# Altium PCB PCB1.PcbDoc
Units mm, origin at the board's own origin, x right, y up, seen from the top; angles counter-clockwise.
Board outline 35.56 x 20.95 mm, 2 copper layers (Top Layer, Bottom Layer), stack 1.671 mm thick; 13 components, 8 nets, 33 pads, 0 vias.
Unrouted connection lines stored in the file: 2.
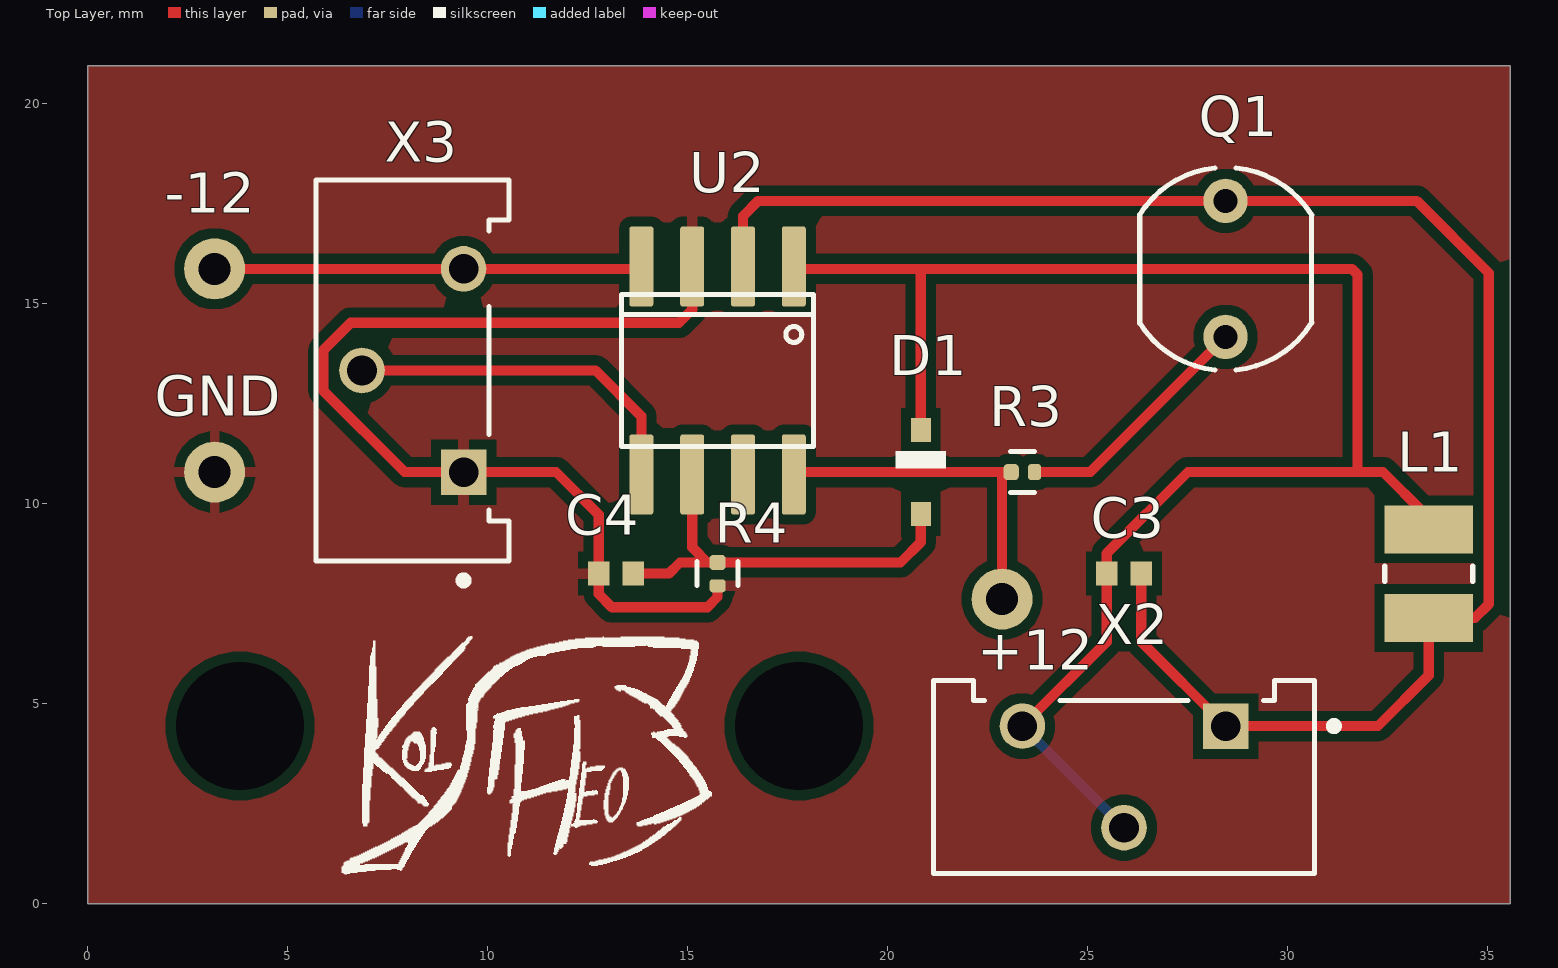
[diagram p0: Top Layer view]
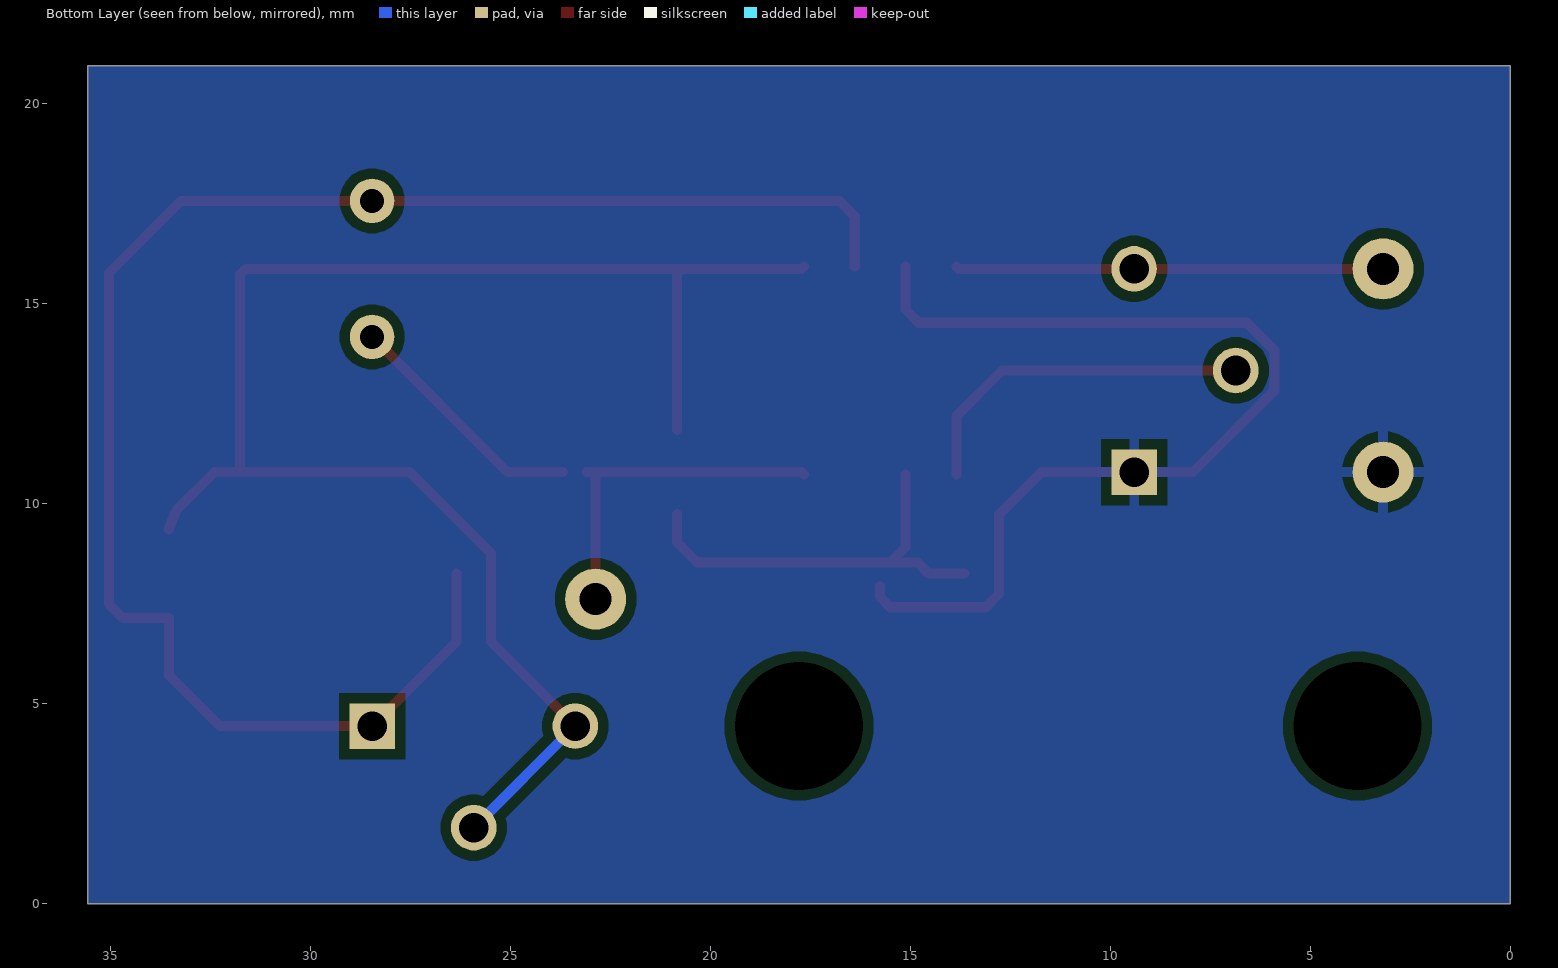
[diagram p1: Bottom Layer view, seen from below]
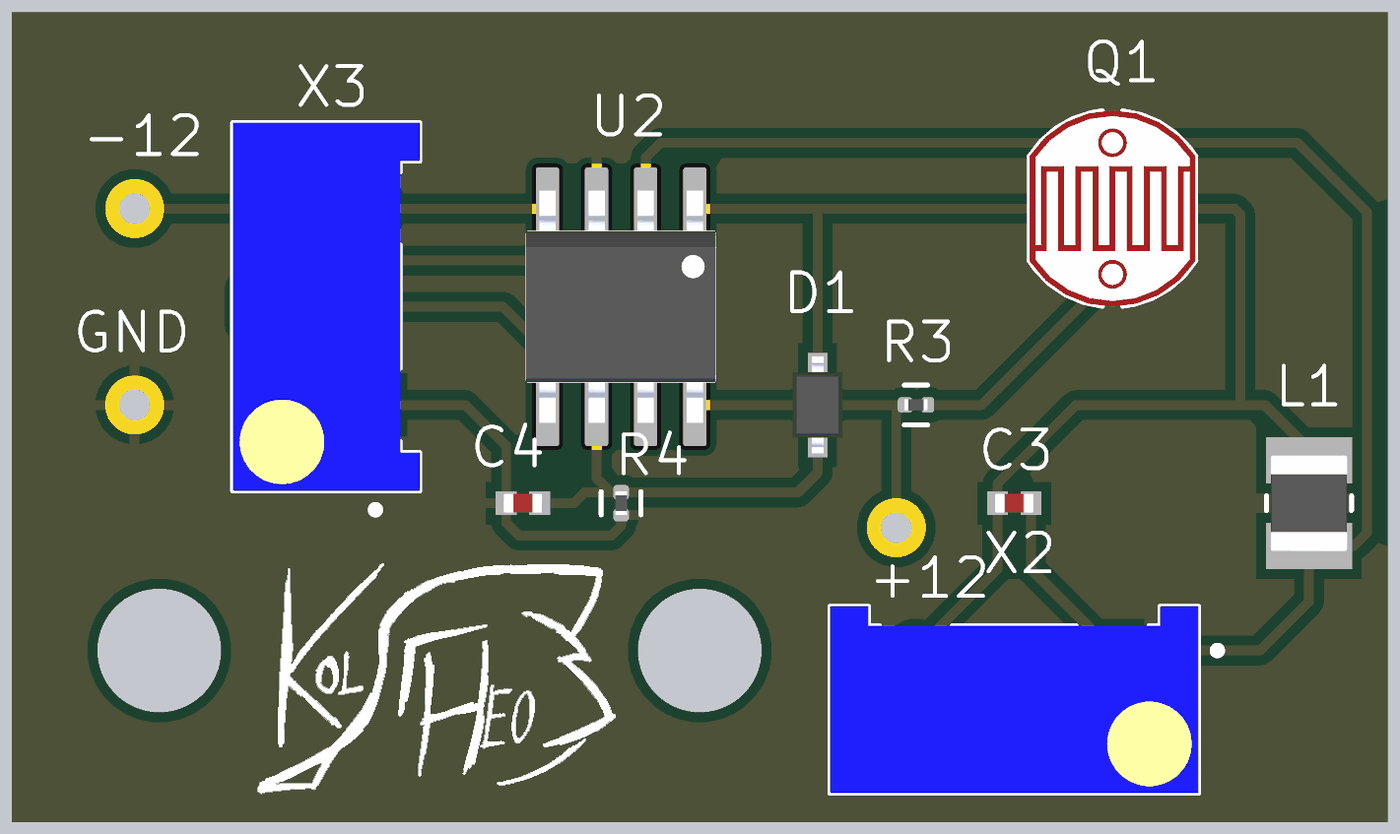
[diagram p2: 3D render of the assembled board from above, using the file's embedded part models]

## Layer stack, top to bottom
Top Solder: solder mask 0.0102, Solder Resist, Dk 3.5
Top Layer: signal copper 0.0356
Dielectric 1: dielectric 1.6, FR-4, Dk 4.8
Bottom Layer: signal copper 0.0356
Bottom Solder: solder mask 0.0102, Solder Resist, Dk 3.5

## Board outline
0,0 0,20.955 35.56,20.955 35.56,0

## Design rules (kind name [scope] priority, off if disabled: settings)
Clearance [All] p1: gap=0.254 ignorepadtopadclearanceinfootprint=FALSE
PolygonConnect [All] p1: connectstyle=Relief reliefconductorwidth=0.254 reliefentries=4 polygonreliefangle="90 Angle" airgapwidth=0.254
RoutingVias [All] p1: holewidth=0.711 width=1.27 viastyle="Through Hole" minholewidth=0.711 minwidth=1.27 maxholewidth=0.711 maxwidth=1.27
SolderMaskExpansion [All] p1: expansion=0 istentingtop=FALSE
SupplyNets "Schematic Supply Nets_2" [InNet('-12V')] p1: voltage=0.000
SupplyNets "Schematic Supply Nets_1" [InNet('GND')] p2: voltage=0.000
SupplyNets "Schematic Supply Nets" [InNet('+12V')] p3: voltage=0.000
Width [All] p1: maxlimit=0.254 minlimit=0.254 preferedwidth=0.254
30 further rules are at their usual default settings.

## Components (designator, comment, footprint, x,y, rotation, side; value= is the part's Value field where it differs from the comment)
+12 "+12V" Pin1 22.86,7.62 r0 top (schematic designator P?)
-12 "Pin1" Pin1 3.175,15.875 r0 top (schematic designator P?)
C3 "GJM1555C1H1R0BB01D" CAPC1005X55N 25.908,8.255 r180 top
C4 "GJM1555C1H1R0BB01D" CAPC1005X55N 13.208,8.255 r0 top
D1 "1N4148WSQ-7-F" SOD2513X120N 20.828,10.795 r270 top
GND "GND" Pin1 3.175,10.795 r0 top (schematic designator P?)
L1 "CVH252009-1R0M" INDC2520X100N 33.528,8.255 r90 top
Q1 "PDV-P5003" XDCR_PDV-P8003 28.448,15.875 r90 top
R3 "RC0201FR-071KL" RESC0603X26N 23.368,10.795 r180 top
R4 "RC0201FR-071KL" RESC0603X26N 15.748,8.255 r90 top
U2 "LM358" SO8 15.748,13.335 r270 top
X2 "3296Y-1-102" TRIM_3296Y-1-102 25.908,3.175 r180 top
X3 "3296Y-1-102" TRIM_3296Y-1-102 8.128,13.335 r90 top

## Footprints (in the part's own frame and the unit in brackets; to place one, negate y for a bottom-side part, rotate by r counter-clockwise, add the part's x,y. Pads: shape width x height; smd on the part's side, far side on the other; paste and mask are expansions set on the pad)
CAPC1005X55N [mm]
  rect 0.54x0.6 smd: 1(-0.432,0) 2(0.432,0)
  body extent -0.5,-0.25 0.5,0.25, height 0.55
INDC2520X100N [mm]
  rect 1.2x2.22 smd: 1(-1.11,0) 2(1.11,0)
  silkscreen extent -0.19,-1.1 0.19,1.1, body extent -1.25,-1 1.25,1, height 1
Pin1 [mil]
  round 60 hole 31.5: 0(0,0)
RESC0603X26N [mm]
  rrect50% 0.33x0.4 smd: 1(-0.305,0)
  rrect50% 0.38x0.4 smd: 2(0.28,0)
  silkscreen extent -0.3,-0.52 0.3,0.52, body extent -0.3,-0.15 0.3,0.15, height 0.26
SO8 [mm]
  rrect20% 2x0.6 smd paste+0 mask+0.102: 1(-2.6,1.905) 2(-2.6,0.635) 3(-2.6,-0.635) 4(-2.6,-1.905) 5(2.6,-1.905) 6(2.6,-0.635) 7(2.6,0.635) 8(2.6,1.905)
  silkscreen extent -1.9,-2.4 1.9,2.4, body extent -3,-2.45 3,2.45, height 1.75
SOD2513X120N [mm]
  rect 0.6x0.5 smd: A(1.05,0) C(-1.05,0)
  silkscreen extent -0.53,-0.63 -0.1,0.63, body extent -1.25,-0.65 1.25,0.65, height 1.2
TRIM_3296Y-1-102 [mm]
  rect 1.14x1.14 / inner round 1.14 / far side rect 1.14x1.14 hole 0.74: 1(-2.54,-1.27)
  round 1.14 hole 0.74: 2(0,1.27) 3(2.54,-1.27)
  silkscreen extent -5.35,-2.41 4.76,2.42, body extent -4.76,-2.41 4.76,2.41, height 11.55
XDCR_PDV-P8003 [mm]
  round 1.108 hole 0.6: A(-1.7,0) C(1.7,0)
  silkscreen extent -2.53,-2.15 2.53,2.15, body extent -2.54,-2.14 2.54,2.14, height 2.38

## Part data
+12 GND: library part Pin1
C3 C4: "0402 1 pF 50 V Â±0.1 pF Tolerance C0G SMT Multilayer Ceramic Capacitor", Package="1005 Taiyo Yuden", Check_prices=https://www.snapeda.com/parts/GJM1555C1H1R0BB01D/Murata/view-part/?ref=eda, MF=Murata, MP=GJM1555C1H1R0BB01D, SnapEDA_Link=https://www.snapeda.com/parts/GJM1555C1H1R0BB01D/Murata/view-part/?ref=snap
D1: "Diode Standard 75 V 150mA Surface Mount SOD-323", Package="SOD-323 Diodes Inc.", Check_prices=https://www.snapeda.com/parts/1N4148WSQ-7-F/Diodes+Inc./view-part/?ref=eda, MF="Diodes Inc.", MP=1N4148WSQ-7-F, SnapEDA_Link=https://www.snapeda.com/parts/1N4148WSQ-7-F/Diodes+Inc./view-part/?ref=snap
L1: "1 µH Shielded Multilayer Inductor 1.6 A 55mOhm Max 1008 (2520 Metric)", Package="1008 Bourns", Availability="In Stock", Check_prices=https://www.snapeda.com/parts/CVH252009-1R0M/Bourns/view-part/?ref=eda, MF=Bourns, MP=CVH252009-1R0M, Price=None, Purchase-URL=https://pricing.snapeda.com/search/part/CVH252009-1R0M/?ref=eda, SnapEDA_Link=https://www.snapeda.com/parts/CVH252009-1R0M/Bourns/view-part/?ref=snap
Q1: "CDS Cells 520nm 12 ~ 58kOhms @ 10 lux", Package=None, Check_prices=https://www.snapeda.com/parts/TLLR4400/Vishay+Semiconductor+Opto+Division/view-part/?ref=eda, MF=Vishay, MP=TLLR4400, SnapEDA_Link=https://www.snapeda.com/parts/TLLR4400/Vishay+Semiconductor+Opto+Division/view-part/?ref=snap
R3 R4: "1 kOhms Â±1% 0.05W, 1/20W Chip Resistor 0201 (0603 Metric) Moisture Resistant Thick Film", Package="0201 Yageo", Check_prices=https://www.snapeda.com/parts/RC0201FR-071KL/Yageo/view-part/?ref=eda, MF=Yageo, MP=RC0201FR-071KL, SnapEDA_Link=https://www.snapeda.com/parts/RC0201FR-071KL/Yageo/view-part/?ref=snap
U2 X2 X3: Package=None
  U2: Check_prices=https://www.snapeda.com/parts/LM358/UTC/view-part/?ref=eda, MF=UTC, MP=LM358, SnapEDA_Link=https://www.snapeda.com/parts/LM358/UTC/view-part/?ref=snap
  X2 X3: Availability=Unavailable, MP=3296Y-1-102, Price=None

## Free pads (board coordinates)
  round 0 hole 3.2 unplated: 3(3.81,4.445) 3(17.78,4.445)

## Nets (pads, with @x,y where several pads share a name; then routed paths per layer and width w, separated by ;. In a path a pad name is that pad's centre, name@x,y a point inside that pad or via, vN(x,y) a via of type N, cw(c..) or ccw(c..) an arc to the next point about the centre after c; other vN are vias at no path point)
+12V: +12.0 R3.2 U2.8 | length 5.5
  Top Layer w0.254: U2.8 17.713,10.795 R3.2
-12V: -12.0 U2.4 X3.3 | length 4.5
  Top Layer w0.254: X3.3 13.783,15.875 U2.4
GND: C4.1 GND.0 R4.1 U2.3 X3.1 | length 25.4
  Top Layer w0.254: U2.3 15.113,14.859 14.783,14.529 6.579,14.529 5.893,13.843 5.893,12.827 7.925,10.795 X3.1 11.709,10.795 12.776,9.728 C4.1 12.776,7.747 13.106,7.417 15.494,7.417 15.748,7.671 R4.1
NetC3_1: C3.1 L1.1 Q1.C U2.2 X2.1 | length 42.4
  Top Layer w0.254: U2.2 16.383,17.194 16.764,17.575 Q1.C 33.225,17.575 35.027,15.773 35.027,7.493 34.679,7.145 L1.1 33.528,5.715 32.258,4.445 X2.1 26.34,6.553 C3.1
NetC3_2: C3.2 D1.C L1.2 U2.1 X2.2 X2.3 | length 41.5
  Top Layer w0.254: U2.1 17.713,15.875 20.828,15.875 ; D1.C 20.828,15.875 ; X2.3 25.476,6.553 C3.2 25.476,8.763 27.508,10.795 31.75,10.795 ; L1.2 33.342,9.838 32.459,10.721 32.385,10.795 31.75,10.795 ; 20.828,15.875 31.601,15.875 31.75,15.726 31.75,10.795
  Bottom Layer w0.254: X2.3 X2.2
NetC4_2: C4.2 D1.A R4.2 U2.6 | length 10.6
  Top Layer w0.254: C4.2 14.529,8.255 14.809,8.535 15.494,8.535 ; U2.6 15.113,8.916 15.494,8.535 ; D1.A 20.828,9.043 20.32,8.535 R4.2 15.494,8.535
NetQ1_A: Q1.A R3.1 | length 6.2
  Top Layer w0.254: R3.1 25.068,10.795 Q1.A
NetU2_5: U2.5 X3.2 | length 8.9
  Top Layer w0.254: X3.2 12.7,13.335 13.843,12.192 U2.5
pads on no net: U2.7
copper on no net: | length 9.4
  Top Layer w0.254: 3.175,15.875 9.398,15.875 ; 22.86,7.62 22.86,10.795

## Polygon pours and split planes (outlines as drawn)
GND on Top Layer "GND_L01_P004" (solid, pour order 4): 0,0 0,20.955 35.56,20.955 35.56,0
GND on Bottom Layer "GND_L02_P006" (solid, pour order 6): 0,0 0,20.955 35.56,20.955 35.56,0

## Silkscreen, mask and mechanical layers (free items; w line width, h text height)
Top Overlay:
  drawing of 10 lines, arcs and shapes, not listed
Mechanical 1:
  the board outline again, w0.254